# Altium PCB MiniSub_Power_Board.PcbDoc
Units mil, origin at the board's own origin, x right, y up, seen from the top; angles counter-clockwise.
Board outline 3225 x 2925 mil, 4 copper layers (Top Layer, Ground, Battery Voltage, Bottom Layer), stack 30.634 mil thick; 43 components, 26 nets, 159 pads, 43 vias.
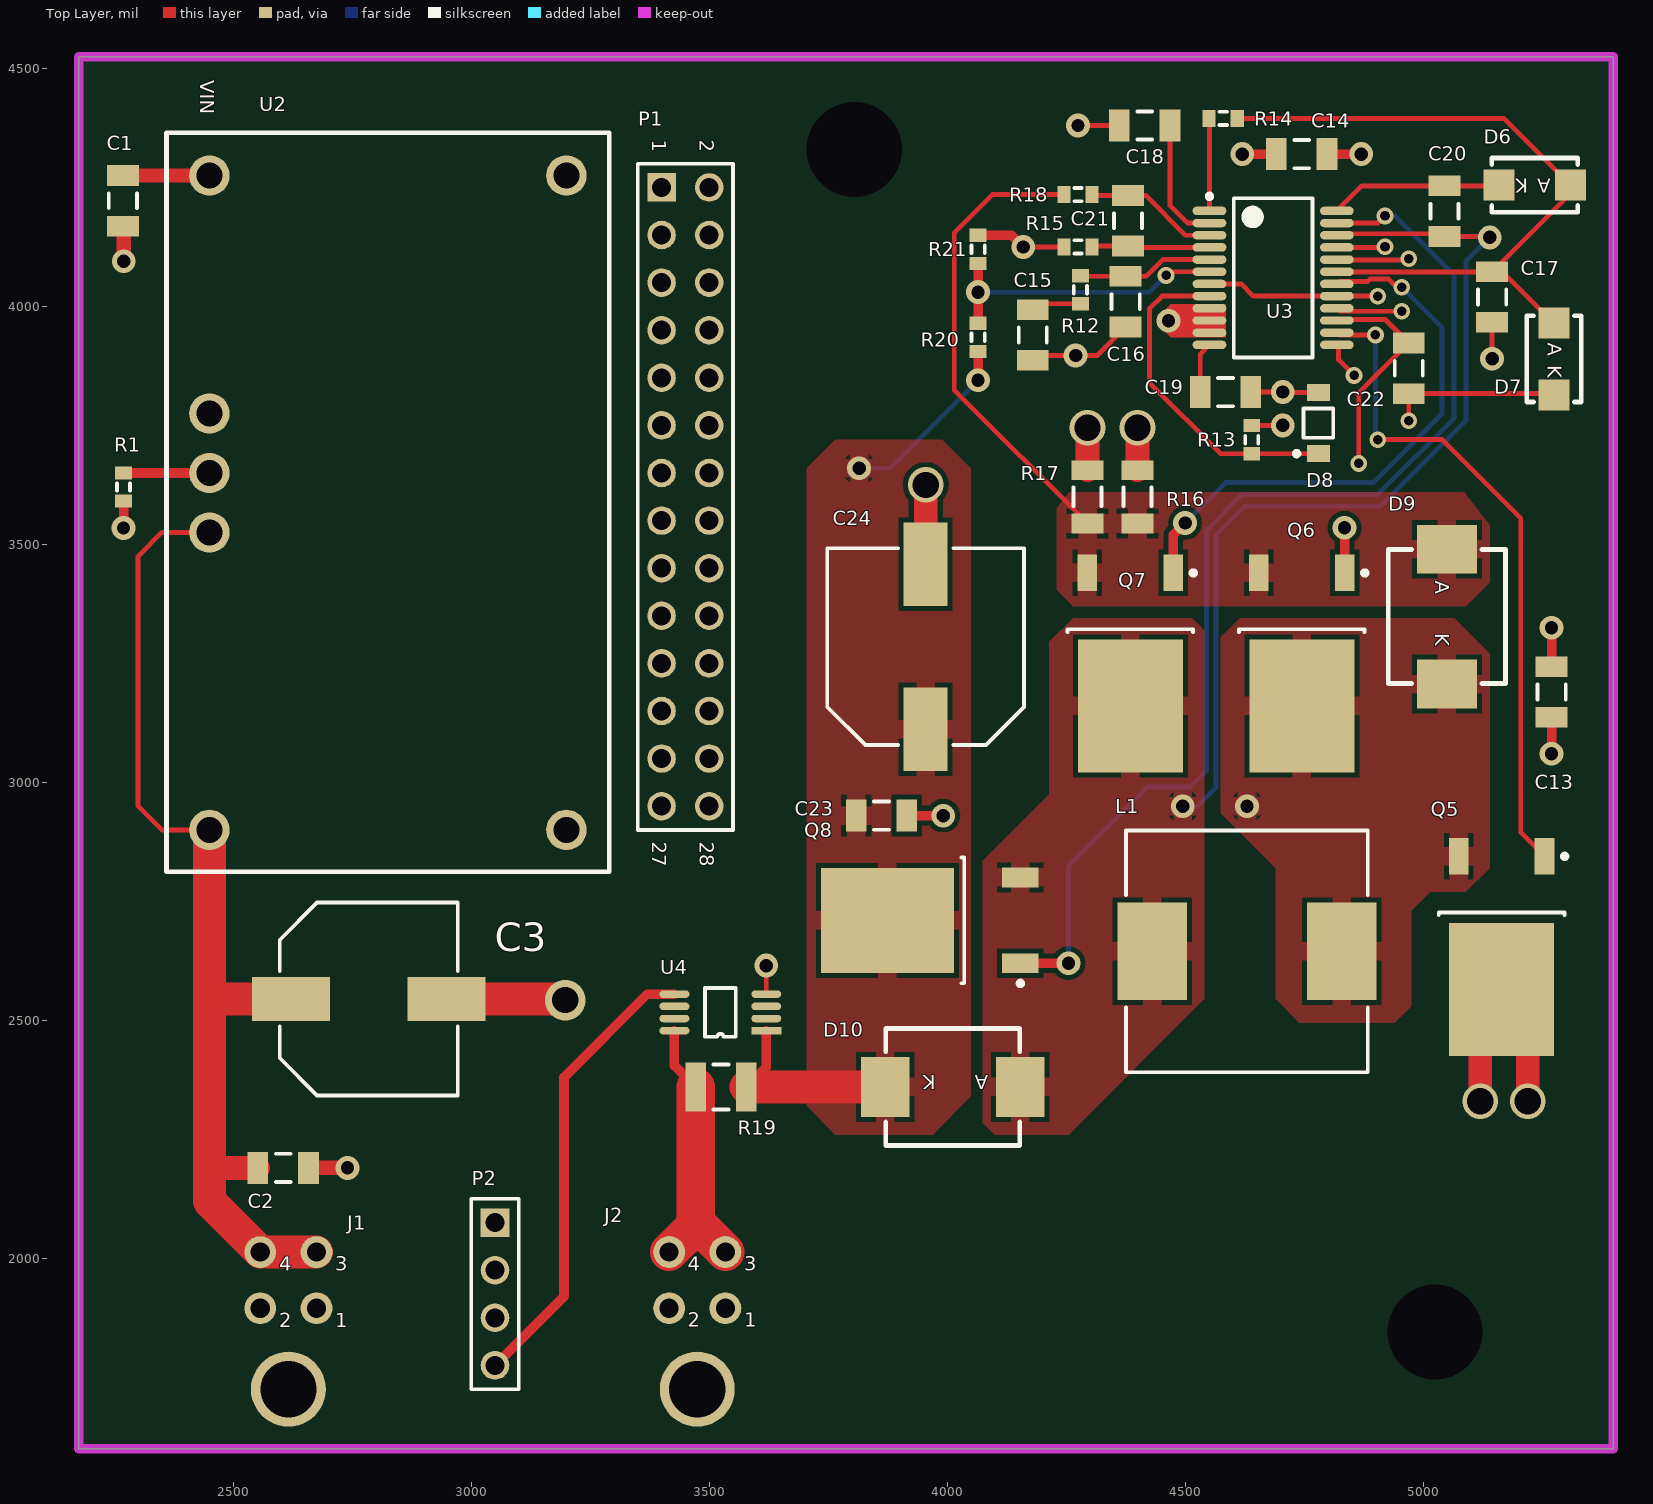
[diagram p0: Top Layer view]
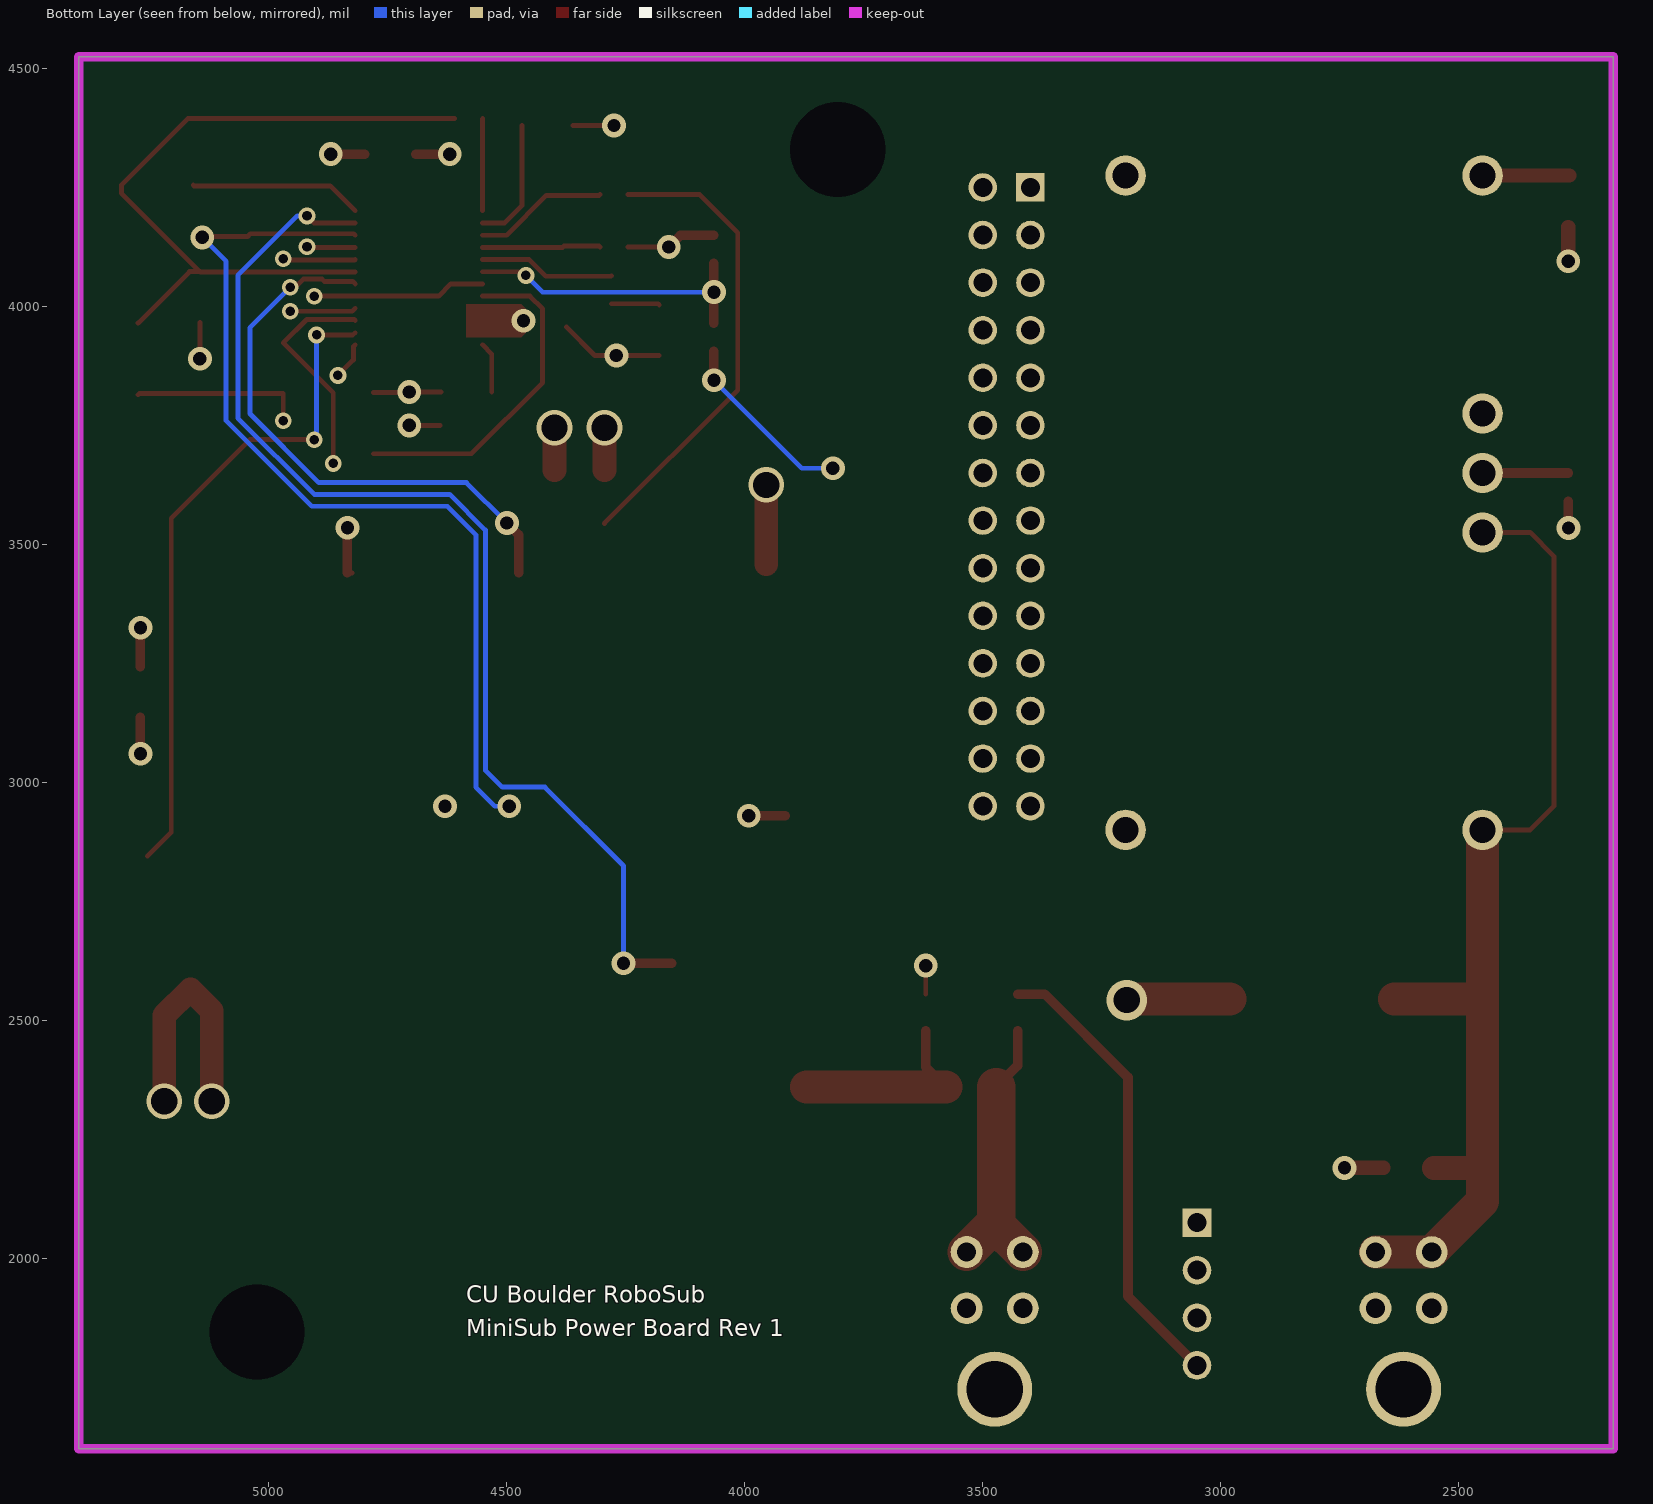
[diagram p1: Bottom Layer view, seen from below]
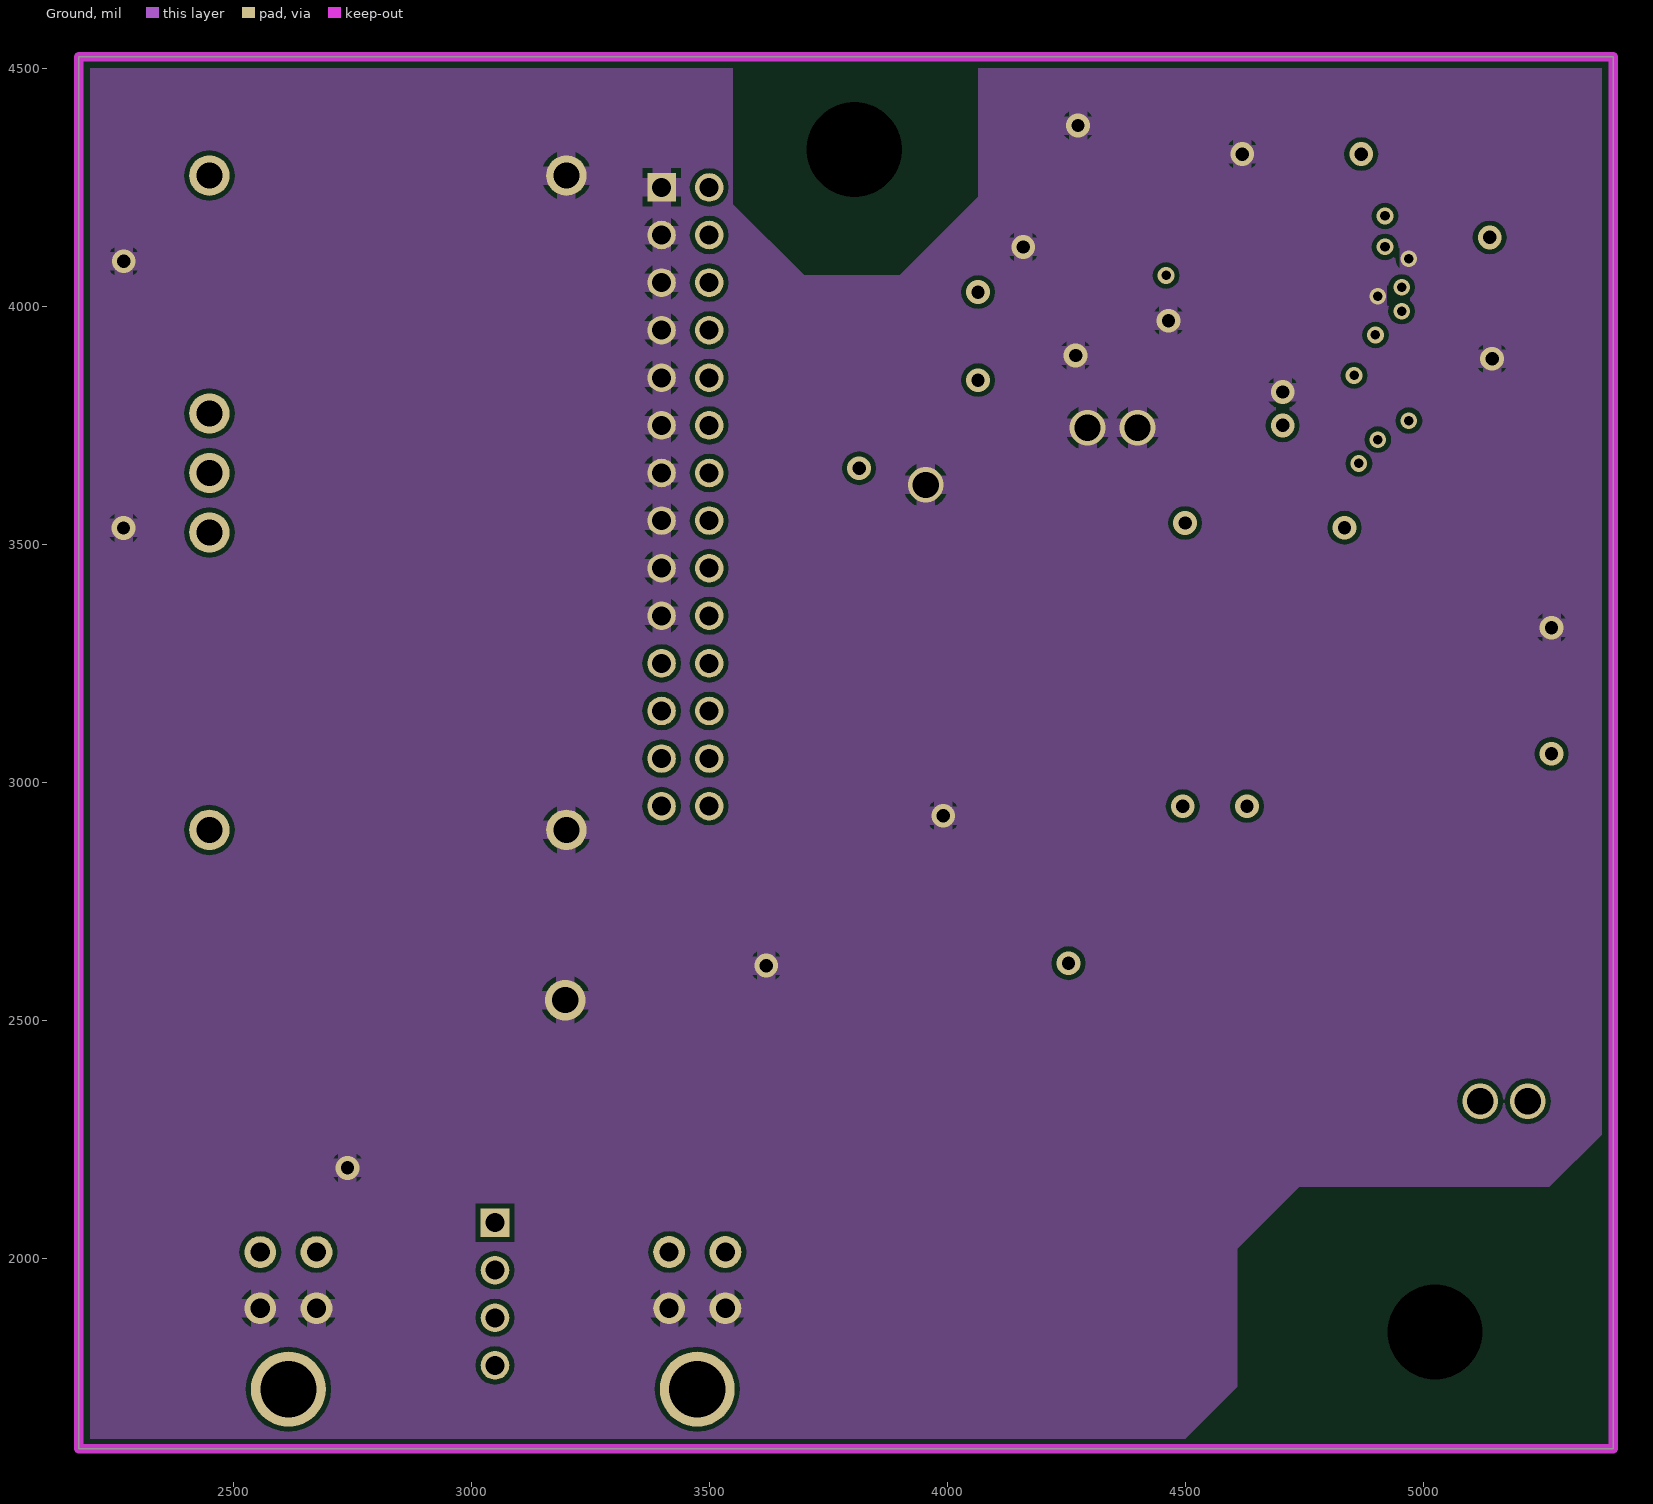
[diagram p2: Ground]
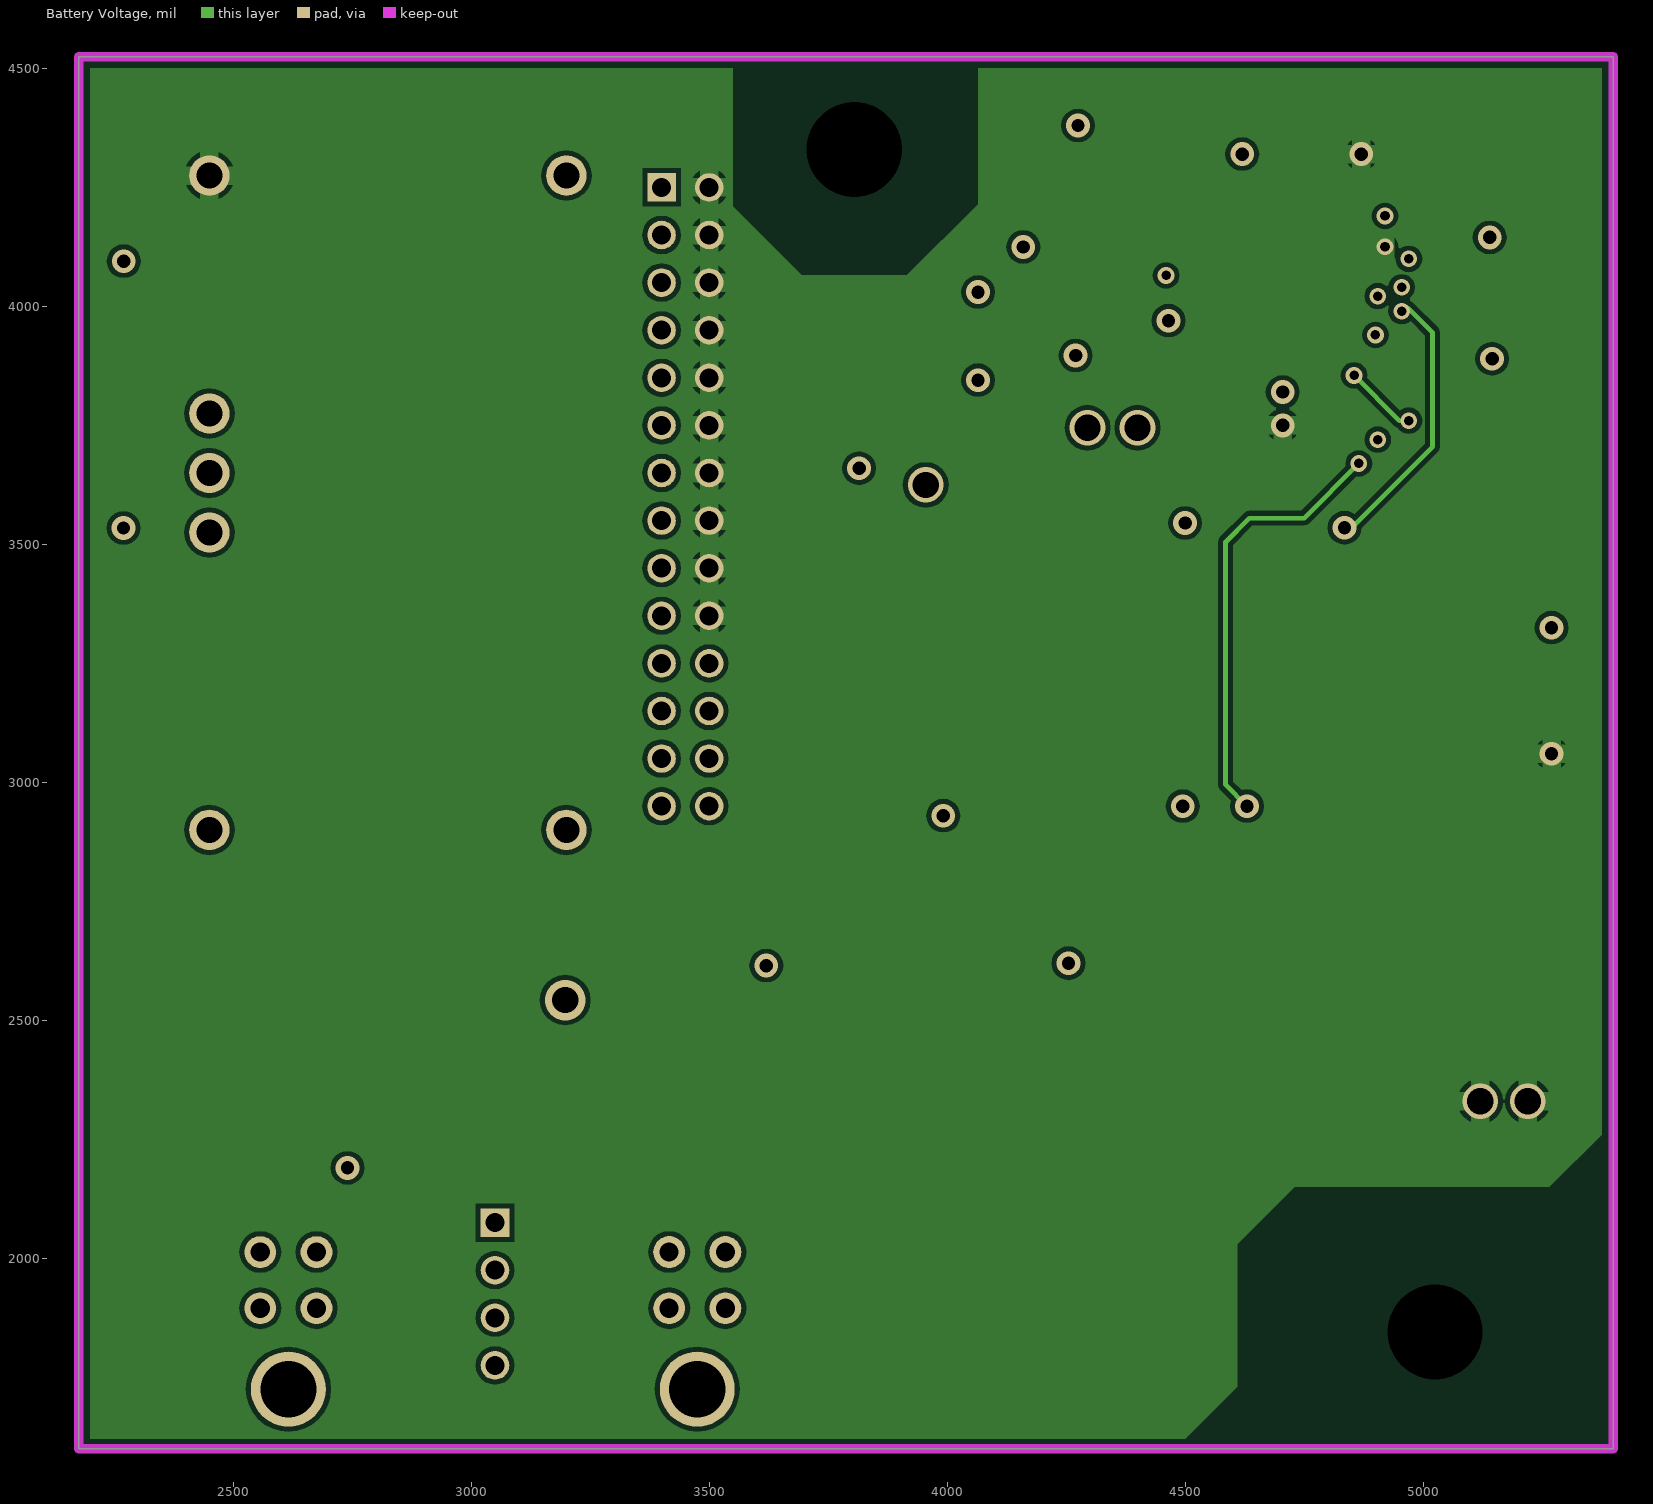
[diagram p3: Battery Voltage]

## Layer stack, top to bottom
Top Solder: solder mask 0.4, Solder Resist, Dk 3.5
Top Layer: signal copper 1.4
Dielectric 1: core 10, FR-4, Dk 4.2
Ground: signal copper 1.417
Dielectric 3: prepreg 5, Dk 4.2
Battery Voltage: signal copper 1.417
Dielectric 2: core 10, Dk 4.2
Bottom Layer: signal copper 1.4
Bottom Solder: solder mask 0.4, Solder Resist, Dk 3.5

## Board outline
2175,1600 2175,4525 5400,4525 5400,1600

## Design rules (kind name [scope] priority, off if disabled: settings)
Clearance Clearance_2 [InNamedPolygon('Battery Voltage-Vbat')] p1: gap=10 ignorepadtopadclearanceinfootprint=FALSE except(0: Arc-Hole Track-Hole SMDPad-Hole THPad-Hole Via-Hole Fill-Hole Poly-Hole Region-Hole Text-Hole)
Clearance Clearance_1 [InNamedPolygon('Top Layer-NetC23_2') Or  InNamedPolygon('Top Layer-NetC20_1') Or  InNamedPolygon('Top Layer-NetC22_1') Or  InNamedPolygon('Top Layer-NetD9_A') Or  InNamedPolygon('Ground')] p2: gap=10 ignorepadtopadclearanceinfootprint=FALSE except(0: Arc-Hole Track-Hole SMDPad-Hole THPad-Hole Via-Hole Fill-Hole Poly-Hole Region-Hole Text-Hole)
Clearance [All] p3: gap=5 ignorepadtopadclearanceinfootprint=FALSE
HoleSize [All] p1: absolutevalues=TRUE maxlimit=200 minlimit=1 maxpercent=80.000 minpercent=20.000
MinimumSolderMaskSliver [All] p1: minsoldermaskwidth=1.5
PolygonConnect PolygonConnect_3 [All vs IsNamedPolygon('Battery Voltage-Vbat')] p1: connectstyle=Relief reliefconductorwidth=40 reliefentries=4 polygonreliefangle="90 Angle" airgapwidth=10
PolygonConnect PolygonConnect_2 [All vs IsNamedPolygon('Top Layer-NetC23_2') Or  IsNamedPolygon('Top Layer-NetC20_1') Or  IsNamedPolygon('Top Layer-NetC22_1') Or  IsNamedPolygon('Top Layer-NetD9_A') Or  IsNamedPolygon('Ground')] p2: connectstyle=Relief reliefconductorwidth=40 reliefentries=4 polygonreliefangle="90 Angle" airgapwidth=10
PolygonConnect PolygonConnect_1 [All vs IsNamedPolygon('Top Layer-NetC23_2') Or  IsNamedPolygon('Top Layer-NetC20_1') Or  IsNamedPolygon('Top Layer-NetC22_1') Or  IsNamedPolygon('Top Layer-NetD9_A') Or  IsNamedPolygon('Ground')] p3: thpad.connectstyle=Relief thpad.reliefconductorwidth=10 thpad.reliefentries=4 thpad.polygonreliefangle="90 Angle" thpad.airgapwidth=10 smdpad.connectstyle=Relief smdpad.reliefconductorwidth=10 smdpad.reliefentries=4 smdpad.polygonreliefangle="90 Angle" smdpad.airgapwidth=10 via.connectstyle=Relief via.reliefconductorwidth=40 via.reliefentries=4 via.polygonreliefangle="90 Angle" via.airgapwidth=10
PolygonConnect [All] p4: connectstyle=Relief reliefconductorwidth=10 reliefentries=4 polygonreliefangle="90 Angle" airgapwidth=10
RoutingVias [All] p1: holewidth=28 width=50 viastyle="Through Hole" minholewidth=15 minwidth=20 maxholewidth=60 maxwidth=100
SilkToSolderMaskClearance [IsPad] p1: minsilkscreentomaskgap=3 clearancetoexposedcopper=TRUE
SolderMaskExpansion [All] p1: expansion=4
Width [All] p1: maxlimit=100 minlimit=10 preferedwidth=10
27 further rules are at their usual default settings.

## Classes and differential pairs
component class MiniSub_Power_Board: J1 J2 P1 P2
component class "5V Converter": C1 C2 C3 R1 U2
component class "12V Converter": C13 C14 C15 C16 C17 C18 C19 C20 C21 C22 C23 C24 D6 D7 D8 D9 D10 L1 Q5 Q6 Q7 Q8 R12 R13 R14 R15 R16 R17 R18 R19 R20 R21 U3 U4

## Components (designator, comment, footprint, x,y, rotation, side; value= is the part's Value field where it differs from the comment)
C1 "Cap Semi" C1206 2268.15,4221.85 r90 top value=3.3uF
C2 "Cap Semi" C1206 2605,2190 r180 top value=1uF
C3 "330uF" UUR1A331 2785,2545 r0 top
C13 "Cap Semi" C1206 5270,3190 r270 top value=22u
C14 "Cap Semi" C1206 4745,4320 r0 top value=3.3u
C15 "Cap Semi" C1206 4180,3940 r90 top value=0.01u
C16 "Cap Semi" C1206 4375,4010 r90 top value=100p
C17 "Cap Semi" C1206 5145,4020 r90 top value=4.7u
C18 "Cap Semi" C1206 4415,4380 r0 top value=0.001u
C19 "Cap Semi" C1206 4585,3820 r180 top value=0.001u
C20 "Cap Semi" C1206 5045,4200 r90 top value=0.22u
C21 "Cap Semi" C1206 4380,4180 r90 top value=100p
C22 "Cap Semi" C1206 4970,3870 r270 top value=0.22u
C23 "Cap Semi" C1206 3861.85,2930 r180 top value=22u
C24 "390uF" PCVxxxxxMCLxGS 3955,3285 r90 top
D6 "1N5819HW" 1N58xx 5310,4255 r180 top
D7 "1N5819HW" 1N58xx 5275,3965 r270 top
D8 "MMSZ5230B" ONSC-SOD-123-2-425-04_V 4780,3755 r90 top
D9 "MBRS340" MBRS340 5050,3490 r270 top
D10 "MBRS340" MBRS340 4153.46,2360 r180 top
J1 "Molex 43045-0402" Molex43045-0402 2556.89,1895 r0 top
J2 "Molex 43045-0402" Molex43045-0402 3415.94,1895.08 r0 top
L1 "SRR1240-4R7M" SRR1240 4630,2645 r180 top
P1 "Header 14X2" "Header 2x14" 3440,3598 r270 top
P2 "Header 4" "Header 1x4" 3050,2075 r270 top
Q5 "BUK6212" NXP-SOT428_M 5165,2655.55 r270 top
Q6 "BUK6212" NXP-SOT428_M 4745.16,3251.02 r270 top
Q7 "BUK6212" NXP-SOT428_M 4384.84,3251.02 r270 top
Q8 "BUK6212" NXP-SOT428_M 3965,2710 r180 top
R1 "Res3" J1-0603 2269.53,3620.47 r90 top value=21K
R12 "Res3" J1-0603 4280,4035 r90 top value=100k
R13 "Res3" J1-0603 4640,3720 r90 top value=51k
R14 "Res3" J1-0603 4580,4395 r180 top value=100k
R15 "Res3" J1-0603 4275,4125 r180 top value=100
R16 "Res3" R1206 4400,3600 r270 top value=0.018
R17 "Res3" R1206 4295,3600 r270 top value=0.018
R18 "Res3" J1-0603 4275,4235 r180 top value=100
R19 "Res3" 14-1210 3525,2360 r180 top value=1m
R20 "Res3" J1-0603 4065,3935 r270 top value=113k
R21 "Res3" J1-0603 4065,4120 r270 top value=8.06k
U2 "PTN78020WAH" PTN78020WAH 3200,4275 r270 top
U3 "LTC3780EG#PBF" LT-G-24_L 4685,4060 r0 top
U4 "AD8217" AD8217 3620,2478.23 r180 top

## Footprints (in the part's own frame and the unit in brackets; to place one, negate y for a bottom-side part, rotate by r counter-clockwise, add the part's x,y. Pads: shape width x height; smd on the part's side, far side on the other; paste and mask are expansions set on the pad)
1N58xx [mm] "1A Schottky Barrier Rectifier Diode"
  rect 1.655x1.67 smd: A(0,0) K(3.83,0)
  silkscreen extent -0.39,-1.45 4.22,1.45
14-1210 [mm] "Chip Resistor, Body 3.2x2.5mm, IPC High Density"
  rect 1.1x2.6 smd: 1(-1.35,0) 2(1.35,0)
  silkscreen extent -0.4,-1.2 0.4,1.2, body extent -1.68,-1.32 1.68,1.32, height 0.9
AD8217 [mm] "High Resolution, Zero-Drift Current Shunt Monitor"
  rect 1.6x0.4 smd: 1(0,0)
  oval 1.6x0.4 smd: 2(0,-0.65) 3(0,-1.3) 4(0,-1.95) 5(4.9,-1.95) 6(4.9,-1.3) 7(4.9,-0.65) 8(4.9,0)
  silkscreen extent 1.63,-2.28 3.27,0.33
C1206 [mm] "Chip Capacitor, Body 3.2x1.6mm, IPC High Density"
  rect 1.1x1.7 smd: 1(-1.35,0) 2(1.35,0)
  silkscreen extent -0.4,-0.75 0.4,0.75, body extent -1.7,-0.9 1.7,0.9, height 1.3
"Header 1x4" [mil]
  rect 60x60 hole 40: 1(0,0)
  round 60 hole 40: 2(100,0) 3(200,0) 4(300,0)
  silkscreen extent -50,-50 350,50
"Header 2x14" [mil]
  rect 60x60 hole 40: 1(-652,-40)
  round 60 hole 40: 2(-652,60) 3(-552,-40) 4(-552,60) 5(-452,-40) 6(-452,60) 7(-352,-40) 8(-352,60) 9(-252,-40) 10(-252,60) 11(-152,-40) 12(-152,60) 13(-52,-40) 14(-52,60) 15(48,-40) 16(48,60) 17(148,-40) 18(148,60) 19(248,-40) 20(248,60) 21(348,-40) 22(348,60) 23(448,-40) 24(448,60) 25(548,-40) 26(548,60) 27(648,-40) 28(648,60)
  silkscreen extent -702,-90 698,110
J1-0603 [mm] "Chip Resistor, Body 1.6x0.8mm, IPC High Density"
  rect 0.7x0.9 smd: 1(-0.75,0) 2(0.75,0)
  silkscreen extent -0.2,-0.35 0.2,0.35, body extent -0.85,-0.48 0.85,0.48, height 0.9
LT-G-24_L [mm] "SOP, 24-Leads, Body 8.5x5.6mm, Pitch 0.65mm, IPC High Density"
  oval 1.8x0.45 smd: 1(-3.4,3.575) 2(-3.4,2.925) 3(-3.4,2.275) 4(-3.4,1.625) 5(-3.4,0.975) 6(-3.4,0.325) 7(-3.4,-0.325) 8(-3.4,-0.975) 9(-3.4,-1.625) 10(-3.4,-2.275) 11(-3.4,-2.925) 12(-3.4,-3.575) 13(3.4,-3.575) 14(3.4,-2.925) 15(3.4,-2.275) 16(3.4,-1.625) 17(3.4,-0.975) 18(3.4,-0.325) 19(3.4,0.325) 20(3.4,0.975) 21(3.4,1.625) 22(3.4,2.275) 23(3.4,2.925) 24(3.4,3.575)
  silkscreen extent -3.52,-4.25 2.1,4.47, body extent -2.8,-4.25 2.8,4.25, height 2
MBRS340 [mm] "Schottky Rectifier"
  rect 2.6x3.2 smd: A(0,0) K(7.2,0)
  silkscreen extent 0.02,-3.13 7.17,3.13
Molex43045-0402 [mm] "43045-0402"
  round 1.7 hole 1.02: 1(3,0) 2(0,0) 3(3,3) 4(0,3)
  round 4 hole 3 unplated: ""(1.5,-4.32)
  body extent -3.57,-8.95 6.58,3.29, height 8.83
NXP-SOT428_M [mm] "DPAK, 3-Leads, Body 6.75x6.22mm, Pitch 2.29mm, IPC Low Density"
  rect 7.1x5.6 smd: D(2.3,0)
  rect 1.95x1.05 smd: G(-4.8,2.29) S(-4.8,-2.29)
  silkscreen extent -4.92,-3.35 -1.65,3.49, body extent -1.8,-3.37 4.42,3.37, height 2.38
ONSC-SOD-123-2-425-04_V [mm] "SOD, 2-Leads, Body 2.69x1.6mm"
  rect 0.91x1.22 smd: 1(-1.635,0) 2(1.635,0)
  silkscreen extent -1.76,-0.8 0.78,1.28, body extent -1.35,-0.8 1.35,0.8, height 1.35
PCVxxxxxMCLxGS [mm] "Aluminum Electrolytic Capacitor, Body 10.30x10.30x12.70mm, IPC Low Density"
  rect 4.45x2.35 smd: 1(-4.4,0) 2(4.4,0)
  silkscreen extent -5.25,-5.25 5.25,5.25, body extent -5.25,-5.25 5.25,5.25, height 12.7
PTN78020WAH [mil] "https://www.digikey.com/product-detail/en/texas-instruments/PTN78020WAH/296-20515-ND/717485"
  round 85 hole 55: 1(0,0) 2(0,-750) 3(500,-750) 4(625,-750) 5(750,-750) 6(1375,-750) 7(1375,0)
  Top Layer region: -35,35
  Top Layer region: -35,-715
  silkscreen extent -90,-840 1463,90
R1206 [mm] "Chip Resistor, 2-Leads, Body 3.10x1.60mm, IPC Medium Density"
  rect 1.05x1.7 smd: 1(-1.425,0) 2(1.425,0)
  silkscreen extent -0.5,-0.75 0.5,0.75, body extent -1.6,-0.85 1.6,0.85, height 0.65
SRR1240 [mm] "Molded Inductor, 2-Leads, Body 12.50x12.50mm, IPC Medium Density"
  rect 3.7x5.2 smd: 1(-5.05,0) 2(5.05,0)
  silkscreen extent -6.45,-6.45 6.45,6.45, body extent -6.4,-6.4 6.4,6.4, height 4.5
UUR1A331 [mm] "Aluminum Electrolytic Capacitor, Body 9.50x10.30x10.30mm, IPC Low Density"
  rect 4.15x2.35 smd: 1(-4.15,0) 2(4.15,0)
  silkscreen extent -4.75,-5.15 4.75,5.15, body extent -4.75,-5.15 4.75,5.15, height 10.3

## Part data
C1 C2 C13 C14 C15 C16 C17 C18 C19 C20 C21 C22 C23: "Capacitor (Semiconductor SIM Model)", LatestRevisionDate=29-May-2009, LatestRevisionNote="IPC-7351 Footprint Added.", PackageDescription="Chip Capacitor", PackageReference=C1206, Published=8-Jun-2000, Publisher="Altium Limited"
C3 C24: library part PCV1E391MCL2GS, "CAP ALUM POLY 390UF 20% 25V SMD", Datasheet=http://nichicon-us.com/english/products/pdfs/e-pcv.pdf, Digikey=https://www.digikey.com/product-detail/en/nichicon/PCV1E391MCL2GS/493-4544-1-ND/2786841
D6 D7: library part 1N58xx, "1A Schottky Barrier Rectifier Diode", Datasheet=http://www.kesenes.com/pdf/1n5817-1n5819.pdf
D8: library part MMSZ5230BT1G, "Zener Voltage Regulator, 500 mW, 2-Pin SOD-123, Pb-Free, Tape and Reel", Manufacturer="On Semiconductor", Supplier Part Number 1=MMSZ5230BT1GOSTR-ND, ComponentLink1Description="Manufacturer URL", ComponentLink1URL=http://www.onsemi.com/, ComponentLink2Description=Datasheet, ComponentLink2URL=http://www.onsemi.com/pub_link/Collateral/MMSZ5221BT1-D.PDF, ComponentLink3Description="Package Specification", ComponentLink3URL=http://www.onsemi.com/pub_link/Collateral/425-04.PDF, DatasheetVersion="Rev. 12", Mounting Technology="Surface Mount", PackageDescription="2-Pin SOD, Body 1.6 x 2.69 mm", PackageReference=SOD-123-2-425-04, PackageVersion="Rev. G, 10/2009", Packing="Tape and Reel", PartNumber=MMSZ5230BT1G, P Max (W)=0.5, RoHS=Pb-Free, Supplier 1=Digi-Key, Supplier 2=Digi-Key, Supplier 3=Digi-Key, Supplier 4=Farnell, Supplier 5=Farnell, Supplier 6=Farnell, Supplier 7=Newark, Supplier 8=Newark, Supplier 9=Mouser, Supplier Part Number 2=MMSZ5230BT1GOSCT-ND, Supplier Part Number 3=MMSZ5230BT1GOSDKR-ND, Supplier Part Number 4=1431272, Supplier Part Number 5=1431272RL, Supplier Part Number 6=2370826, Supplier Part Number 7=83H7423, Supplier Part Number 8=67R1368, Supplier Part Number 9=863-MMSZ5230BT1G, VZ Typ (V)=4.7
D9 D10: "Schottky Rectifier", Datasheet=https://www.mouser.com/ds/2/308/MBRS340-1120985.pdf
J1 J2: library part Molex43045-0402, "Micro-Fit 3.0 Right Angle Header, 3.00mm Pitch, Dual Row, 4 Circuits, with Snap-in Plastic Peg PCB Lock, Gold, Glow Wire Capable, Black", ComponentLink1Description="Molex Website", ComponentLink1URL=https://www.molex.com/molex/products/datasheet.jsp?part=active/0430450402_PCB_HEADERS.xml
L1: library part SRR1240, "FIXED IND 4.7UH 6A 18 MOHM SMD", Datasheet=https://www.bourns.com/docs/Product-Datasheets/SRR1240.pdf, Digikey=https://www.digikey.com/product-detail/en/bourns-inc/SRR1240-4R7M/SRR1240-4R7MCT-ND/2127398
P1: "Header, 14-Pin, Dual row", LatestRevisionDate=17-Jul-2002, LatestRevisionNote="Re-released for DXP Platform.", Publisher="Altium Limited"
P2: "Header, 4-Pin", LatestRevisionDate=17-Jul-2002, LatestRevisionNote="Re-released for DXP Platform.", Publisher="Altium Limited"
Q5 Q6 Q7 Q8: "N-Channel TrenchMOS Intermediate Level FET, 40 V, 50 A, 3-Pin SOT428, Tape and Reel", Manufacturer="NXP Semiconductors", PartNumber=BUK6212-40C,118, Supplier Part Number 1=568-6983-2-ND, Automotive Qualified=Y, Channel Type=N, Code_JEDEC=TO-252, Code_JEITA=SC-63, ComponentLink1Description="Manufacturer URL", ComponentLink1URL=http://www.nxp.com/, ComponentLink2Description=Datasheet, ComponentLink2URL=http://www.nxp.com/documents/data_sheet/BUK6212-40C.pdf, ComponentLink3Description="Package Specification", ComponentLink3URL=http://www.nxp.com/documents/outline_drawing/sot428_po.pdf, DatasheetVersion="Rev. 2", ID [max] (A)=50, IDM [max] (A)=233, Mounting Technology="Surface Mount", PackageDescription="3-Pin Plastic Single-ended Surface Mounted Package, Body 6.1 x 6.6 mm, Pitch 2.285 mm", PackageReference=SOT428, PackageVersion="14-06-10, 06/2014", Packing="Tape & Reel", Qr [typ] (nC)=38, Supplier 1=Digi-Key, Supplier 2=Digi-Key, Supplier 3=Digi-Key, Supplier 4=Mouser, Supplier Part Number 2=568-6983-1-ND, Supplier Part Number 3=568-6983-6-ND, Supplier Part Number 4=771-BUK621240C118, VDS [max] (V)=40, VGSth [typ] (V)=2.3
R1 R12 R13 R14 R15 R16 R17 R18 R19 R20 R21: "Resistor", LatestRevisionDate=29-May-2009, LatestRevisionNote="IPC-7351 Footprint Added.", PackageDescription="Chip Resistor", PackageReference=J1-0603, Published=8-Jun-2000, Publisher="Altium Limited"
U2: "6A DC DC Converter"
U3: "Buck-boost Controller, Constant Frequency, Current Mode Control with Power Good Output, 24-pin SOP (G-24), -40 to 85 degC, Pb-Free", Frequency Sync Range="200kHz - 400kHz", Manufacturer="Linear Technology", Supplier Part Number 1=LTC3780EG#PBF-ND, ComponentLink1Description="Manufacturer URL", ComponentLink1URL=http://www.linear.com/, ComponentLink2Description=Datasheet, ComponentLink2URL=http://cds.linear.com/docs/en/datasheet/3780ff.pdf, ComponentLink3Description="Package Specification", ComponentLink3URL=http://cds.linear.com/docs/en/packaging/SSOP_24_05-08-1640.pdf, DatasheetVersion="Rev. F", Mounting Technology="Surface Mount", Number of Outputs=1, PackageDescription="24-Pin Plastic SSOP, Body 8.2 x 5.3 mm, Pitch 0.65 mm", PackageReference=G-24, PackageVersion=Jun-10, PartNumber=LTC3780EG#PBF, RoHS=TRUE, Supplier 1=Digi-Key, Supplier 2=Farnell, Supplier 3=Newark, Supplier Part Number 2=1273545, Supplier Part Number 3=56M8395
U4: "High Resolution, Zero-Drift  Current Shunt Monitor", Datasheet=https://www.analog.com/media/en/technical-documentation/data-sheets/AD8217.pdf

## Free pads (board coordinates)
  round 0 hole 200 unplated: 0(3805,4330) 0(5025,1845)

## Via types
v1: diameter 50, hole 28, Top Layer to Bottom Layer, 25 vias
v2: diameter 35, hole 20, Top Layer to Bottom Layer, 12 vias
v3: diameter 75, hole 55, Top Layer to Bottom Layer, 5 vias
v4: diameter 85, hole 55, Top Layer to Bottom Layer, 1 vias

## Nets (pads, with @x,y where several pads share a name; then routed paths per layer and width w, separated by ;. In a path a pad name is that pad's centre, name@x,y a point inside that pad or via, vN(x,y) a via of type N, cw(c..) or ccw(c..) an arc to the next point about the centre after c; other vN are vias at no path point)
5V: C2.2 C3.1 J1.3 J1.4 U2.5 U2.6 | length 2208.8
  Top Layer w10: 2450,2175 2465,2190 ; U2.6 2350,2900 2300,2950 2300,3475 2350,3525 U2.5
  Top Layer w50: 2465,2190 C2.2
  Top Layer w70: U2.6 2450,2545 ; C3.1@2635,2545 2450,2545 ; J1.3 J1.4 2450,2120 2450,2175 2450,2545
12V: J2.3 J2.4 R19.2 U4.8 | length 594.7
  Top Layer w20: U4.8 3427.09,2404.76 R19.2
  Top Layer w80: J2.4 3471.85,2069.09 3471.85,2075.39 ; R19.2 3471.85,2075.39 ; J2.3 3471.85,2075.39
12Vcur: P2.4 U4.5 | length 969.6
  Top Layer w20: P2.4 3195,1920 3195,2380 3370,2555 U4.5
BG1-19V: Q7.G U3.18 | length 1198.5
  Top Layer w10: U3.18 4824.15,4052.5 4883.61,4052.5 4888.61,4057.5 4927.5,4057.5 4945,4040 v2(4955,4040)
  Top Layer w20: Q7.G 4475,3520 v1(4500,3545)
  Bottom Layer w10: v1(4500,3545) 4585,3630 4895,3630 5040,3775 5040,3955 v2(4955,4040)
BG2-19V: Q6.G U3.16 | length 817.8
  Top Layer w10: U3.16 4824.88,3990 v2(4955,3990) ; Q6.G@4825,3440.32 Q6.G@4825.31,3440
  Top Layer w20: Q6.G@4835,3440.32 v1(4835,3535)
  Battery Voltage w10: v1(4835,3535) 4850,3535 5020,3705 5020,3945 4968.98,3996.02 4962.95,3990 v2(4955,3990)
GND: C1.1 C2.1 C3.2 C13.1 C14.1 C15.1 C16.1 C17.1 C18.1 C19.1 C23.1 C24.2 D8.2 J1.1 J1.2 J2.1 J2.2 P1.1 P1.3 P1.5 P1.7 P1.9 P1.11 P1.13 P1.15 P1.17 P1.19 R1.1 R15.2 R16.1 R17.1 R21.1 U2.1 U2.7 U3.7 U3.9 U3.10 U3.11 U3.17 U3.20 U4.4 | length 2312.4
  Top Layer w10: v1@2255,3530 v1@2265,3520 ; C1.1 C1.1@2270,4166.85 ; v4@3195,2545 v4(3197.5,2542.5) ; U4.4 v1(3620,2615) ; v1(4160,4125) R15.2 ; C15.1@4180,3896.85 v1(4270,3896.85) 4315,3896.85 C16.1 ; v1(4275,4380) C18.1 ; U3.7 4617.8,4047.2 4643.39,4021.61 U3.17 4818.94,4021.69 v2(4905,4021.69) ; C19.1 v1(4705,3820) 4705.63,3819.37 D8.2 ; U3.20 4819.74,4097.5 4967.5,4097.5 v2(4970,4100) ; v1(5145,3890) C17.1
  Top Layer w20: v1(2269.53,3534.53) R1.1 ; C23.1 v1(3991.85,2930) ; R21.1 4135.47,4149.53 v1(4160,4125) ; v1(4620,4320) C14.1 ; C13.1 v1(5270,3325)
  Top Layer w30: v1(2270,4095) C1.1@2270,4166.85 ; C2.1 v1(2740,2190)
  Top Layer w50: C24.2 v3(3955,3625) ; R17.1 v3(4295,3745) ; R16.1 v3(4400,3745)
  Top Layer w70: C3.2@2981.46,2545 v4@3195,2545
  other v1: 4465,3970
NetC15_2: C15.2 R12.1 | length 101
  Top Layer w10: C15.2@4180,4003.15 4182.32,4005.47 R12.1
NetC16_2: C16.2 R12.2 U3.5 | length 286.3
  Top Layer w10: R12.2 4281.38,4063.15 C16.2 4418.15,4063.15 4453.39,4098.39 U3.5
NetC17_2: C17.2 D6.A D7.A R14.1 U3.19 | length 1510
  Top Layer w10: R14.1 5170,4395 D6.A 5310,4238.15 C17.2 ; U3.19 4819.15,4072.5 5144.35,4072.5 C17.2 ; D7.A 5166.85,4073.15 C17.2
NetC18_2: C18.2 U3.2 | length 266.2
  Top Layer w10: C18.2 4468.15,4212.17 4505.16,4175.16 U3.2
NetC19_2: C19.2 U3.12 | length 107.2
  Top Layer w10: C19.2 4531.85,3899.96 U3.12
NetC20_1: C20.1 D10.A L1.2 Q7.D Q8.S U3.22 | length 1972.2
  Top Layer w10: U3.22 4821.79,4152.5 5039.35,4152.5 C20.1 5138.15,4146.85 v1(5140,4145)
  Bottom Layer w10: v1(4495,2950) 4525,2950 4565,2990 4565,3520 4625,3580 4910,3580 5090,3760 5090,4095 v1(5140,4145)
NetC20_2: C20.2 D6.K U3.24 | length 362.8
  Top Layer w10: U3.24 4871.26,4253.15 C20.2 5157.36,4253.15 D6.K
NetC21_1: C21.1 R15.1 U3.4 | length 248.6
  Top Layer w10: R15.1 4306.38,4126.85 C21.1 4382.87,4123.98 U3.4
NetC21_2: C21.2 R18.1 U3.3 | length 282
  Top Layer w10: R18.1 4306.38,4233.15 C21.2 4416.85,4233.15 4500.43,4149.57 U3.3
NetC22_1: C22.1 D9.K L1.1 Q5.S Q6.D U3.15 | length 1391.1
  Top Layer w10: U3.15 4820.93,3972.5 4920.65,3972.5 C22.1 4865,3818.15 v2(4865,3670)
  Battery Voltage w10: v1(4630,2950) 4585,2995 4585,3505 4635,3555 4750,3555 v2(4865,3670)
NetC22_2: C22.2 D7.K U3.13 | length 596.5
  Top Layer w10: U3.13 4822.4,3915.71 4822.4,3887.6 v2(4855,3855) ; v2(4970,3760) C22.2 5272.36,3816.85 D7.K
  Battery Voltage w10: v2(4855,3855) 4950,3760 v2(4970,3760)
NetC23_2: C23.2 C24.1 D10.K Q8.D R19.1 R20.2 U4.1 | length 814.5
  Top Layer w20: R19.1 3620,2401.85 U4.1 ; v1(4065,3845) R20.2
  Top Layer w70: R19.1 D10.K
  Bottom Layer w10: v1(3815,3660) 3880,3660 v1(4065,3845)
NetD8_1: D8.1 R13.1 U3.8 | length 709.2
  Top Layer w10: U3.8 4451.61,4021.61 4425,3995 4425,3840 4574.53,3690.47 R13.1 4640.16,3690.63 D8.1
NetD9_A: D9.A Q6.S Q7.S R16.2 R17.2 R18.2 | length 990.7
  Top Layer w10: R18.2 4095,4235 4015,4155 4015,3823.9 R17.2
NetR1_2: R1.2 U2.4 | length 180.5
  Top Layer w20: R1.2 U2.4
NetR14_2: R14.2 U3.1 | length 194.5
  Top Layer w10: R14.2 4551.14,4394.33 U3.1
NetR20_1: R20.1 R21.2 U3.6 | length 629.8
  Top Layer w10: v2(4460,4065) 4467.8,4072.8 U3.6
  Top Layer w20: R20.1 v1(4065,4030) R21.2
  Bottom Layer w10: v1(4065,4030) 4425,4030 v2(4460,4065)
TG1-19V: Q8.G U3.23 | length 2405.3
  Top Layer w10: Q8.G Q8.G@4154.13,2620 ; U3.23 4905.16,4175.16 v2(4920,4190)
  Top Layer w20: Q8.G@4154.13,2620 v1(4255,2620)
  Bottom Layer w10: v1(4255,2620) 4255,2825 4420,2990 4510,2990 4545,3025 4545,3530 4620,3605 4905,3605 5065,3765 5065,4065 4940,4190 v2(4920,4190)
TG2-19V: Q5.G U3.14 | length 1404.8
  Top Layer w10: U3.14 4823.7,3940 v2(4900,3940) ; v2(4904.84,3720.16) 5039.84,3720.16 5205,3555 5205,2894.69 Q5.G
  Bottom Layer w10: v2(4900,3940) 4900,3725 v2(4904.84,3720.16)
Vbat: C1.2 C13.2 C14.2 P1.2 P1.4 P1.6 P1.8 P1.10 P1.12 P1.14 P1.16 P1.18 P1.20 Q5.D R13.2 U2.2 U3.21 | length 1008.7
  Top Layer w10: R13.2 4640.47,3750 v1(4705,3750) ; U3.21 4918.98,4123.98 v2(4920,4125)
  Top Layer w20: C14.2 v1(4870,4320) ; v1(5270,3060) C13.2
  Top Layer w30: C1.2 U2.2
  Top Layer w50: v3(5120,2330) 5120,2520 Q5.D 5220,2510 v3(5220,2330)
pads on no net: J1. J2. P1.21 P1.22 P1.23 P1.24 P1.25 P1.26 P1.27 P1.28 P2.1 P2.2 P2.3 U2.3 U4.2 U4.3 U4.6 U4.7

## Polygon pours and split planes (outlines as drawn)
NetC23_2 on Top Layer "Top Layer-NetC23_2" (solid, pour order 10): 3970,2260 4050,2340 4050,3660 3990,3720 3765,3720 3705,3660 3705,2320 3765,2260
NetC20_1 on Top Layer "Top Layer-NetC20_1" (solid, pour order 12): 4255,2260 4540,2545 4540,3320 4515,3345 4265,3345 4215,3295 4215,2975 4075,2835 4075,2285 4100,2260
NetC22_1 on Top Layer "Top Layer-NetC22_1" (solid, pour order 8): 4940,2495 4975,2530 4975,2730 5015,2770 5090,2770 5140,2820 5140,3270 5065,3345 4615,3345 4575,3305 4575,2935 4690,2820 4690,2545 4740,2495
NetD9_A on Top Layer "Top Layer-NetD9_A" (solid, pour order 6): 4230,3576.25 4230,3405 4265,3370 5090,3370 5140,3420 5140,3540.71 5086.11,3610 4257,3610
Vbat on Battery Voltage "Battery Voltage-Vbat" (solid, pour order 26): 4730,2150 5265,2150 5375,2260 5375,4500 4065,4500 4065,4215 3915,4065 3695,4065 3550,4210 3550,4500 2200,4500 2200,1620 4500,1620 4610,1730 4610,2030
GND on Ground "Ground" (solid, pour order 30): 2200,1620 4500,1620 4610,1730 4610,2020 4740,2150 5265,2150 5375,2260 5375,4500 2200,4500

## Keep-outs
Keep-Out Layer:
  the board outline again, w20

## Other copper
Top Layer:
  rectangle net GND: 4450,3960 4450,3980
  region net GND: 4585,3935 4470,3935 4445,3960 4445,3980 4470,4005 4585,4005
Ground:
  pour cut-out: 3550,4215 3700,4065 3900,4065 4065,4230 4065,4500 3550,4500

## Silkscreen, mask and mechanical layers (free items; w line width, h text height)
Bottom Overlay:
  text "CU Boulder RoboSub" at 4585,1895 h60
  text "MiniSub Power Board Rev 1" at 4585,1825 h60

## Text inside footprints (layer, text, board x,y; h text height)
D6: Top Overlay "A" at 5268.66,4267.8 h30 r180; Top Overlay "K" at 5221.42,4267.8 h30 r180
D7: Top Overlay "K" at 5262.2,3876.42 h30 r270; Top Overlay "A" at 5262.2,3923.66 h30 r270
D9: Top Overlay "A" at 5025.39,3423.07 h30 r270; Top Overlay "K" at 5025.39,3312.83 h30 r270
D10: Top Overlay "K" at 3976.3,2384.61 h30 r180; Top Overlay "A" at 4086.54,2384.61 h30 r180
J1: Top Overlay "1" at 2714.37,1855.63 h30; Top Overlay "2" at 2596.26,1855.63 h30; Top Overlay "4" at 2596.26,1973.74 h30; Top Overlay "3" at 2714.37,1973.74 h30
J2: Top Overlay "3" at 3573.43,1973.82 h30; Top Overlay "4" at 3455.32,1973.82 h30; Top Overlay "2" at 3455.32,1855.71 h30; Top Overlay "1" at 3573.43,1855.71 h30
P1: Top Overlay "28" at 3480,2875 h30 r270; Top Overlay "27" at 3380,2875 h30 r270; Top Overlay "1" at 3380,4350 h30 r270; Top Overlay "2" at 3480,4350 h30 r270
U2: Top Overlay "VIN" at 2431,4475 h30 r270